# Altium PCB Flight Controller SoM.PcbDoc (part 3 of 3)
Units mm, origin at the board's own origin, x right, y up, seen from the top; angles counter-clockwise.
Board outline 55 x 40 mm, 8 copper layers (L1, L2, L3, L4, L5, L6, L7, L8), stack 1.028 mm thick; 176 components, 217 nets, 863 pads, 595 vias.
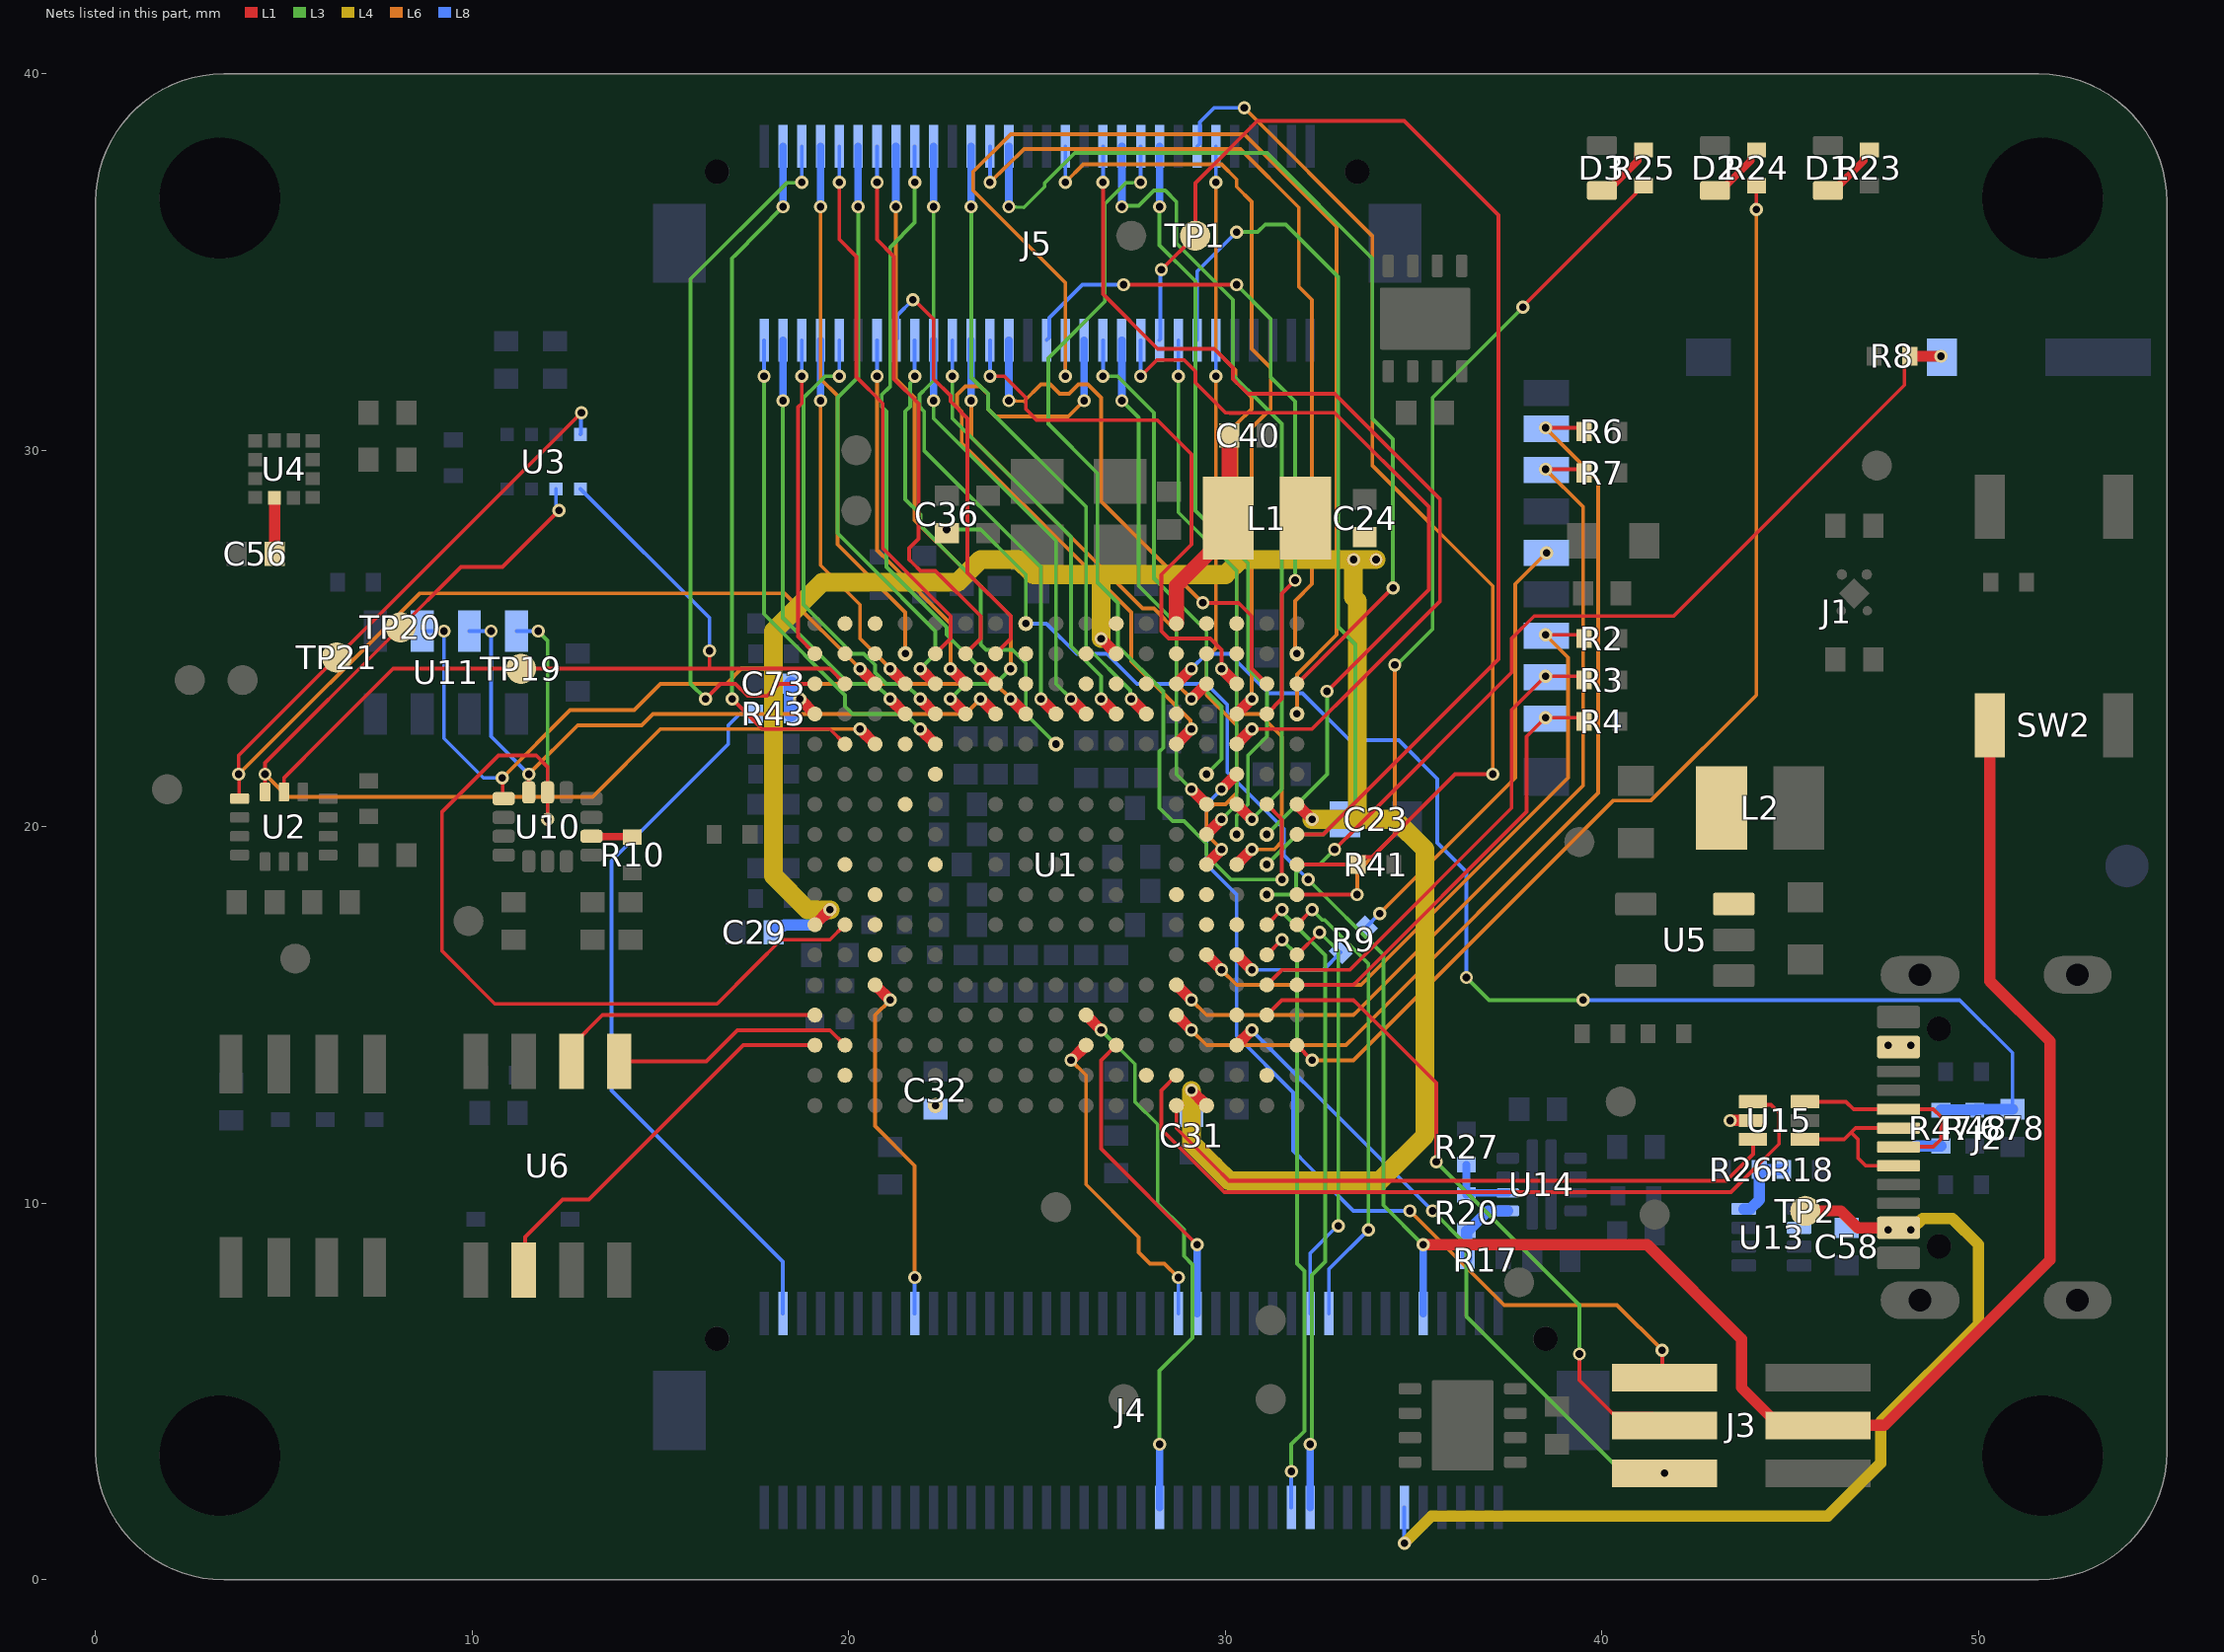
[diagram p9: the nets of this part, all layers, seen from the top]

## Via types
v1: diameter 0.35, hole 0.2, L1 to L8, tented both sides, 595 vias

## Nets (pads, with @x,y where several pads share a name; then routed paths per layer and width w, separated by ;. In a path a pad name is that pad's centre, name@x,y a point inside that pad or via, vN(x,y) a via of type N, cw(c..) or ccw(c..) an arc to the next point about the centre after c; other vN are vias at no path point) (continued)
LED_G: R24.2 U1.A15 | length 30
  L1 w0.1: U1.A15@31.9,14.2 v1(32.3,13.8) ; v1(44.1,36.4) 44.1,36.975 44.05,37.025 R24.2@44.1,37.025
  L6 w0.1: v1(32.3,13.8) 33.4,13.8 33.5,13.9 40.3,20.7 41.3,20.7 44.1,23.5 v1(44.1,36.4)
LED_R: R25.2 U1.A10 | length 23.6
  L1 w0.1: U1.A10@31.9,18.2 32.6,18.2 v1(33.5,18.2) ; v1(37.9,33.8) 37.9,33.825 40.9,36.825 40.9,36.875 41.05,37.025 R25.2@41.1,37.025
  L3 w0.1: v1(34.5,24.3) 34.55,24.3 35.5,25.25 35.5,31.4 v1(37.9,33.8)
  L6 w0.1: v1(33.5,18.2) 33.5,18.8 34.5,19.8 v1(34.5,24.3)
NARMED: J4.47 U1.G15 | length 8.3
  L1 w0.1: U1.G15@27.1,14.2 26.7,13.8 26.7,11.45 v1(29.25,8.9)
  L8 w0.2: J4.47@29.25,7.075 v1(29.25,8.9)
NetC56_1: C56.1 U4.5 | length 1.5
  L1 w0.3: C56.1@4.75,27.25 U4.5@4.75,28.738
NetD1_2: D1.2 R23.1 | length 1.6
  L1 w0.2: D1.2@46,36.9 46.15,36.9 46.95,37.7 46.95,37.875 47.05,37.975 R23.1@47.1,37.975
NetD2_2: D2.2 R24.1 | length 1.6
  L1 w0.2: D2.2@43,36.9 43.15,36.9 43.95,37.7 43.95,37.875 44.05,37.975 R24.1@44.1,37.975
NetD3_2: D3.2 R25.1 | length 1.6
  L1 w0.2: D3.2@40,36.9 40.15,36.9 40.95,37.7 40.95,37.875 41.05,37.975 R25.1@41.1,37.975
NetL2_1: L2.1 U5.3
NetR10_2: R10.2 U10.9 | length 1.1
  L1 w0.2: U10.9@13.165,19.75 13.177,19.738 14.238,19.738 R10.2@14.25,19.725
nRST: C36.1 J3.3 J4.71 SW2.1 U1.K1 | length 64.6
  L1 w0.1: C36.1@22.6,27.8 v1(22.6,27.9)
  L1 w0.3: v1(35.25,8.9) 41.2,8.9 43.7,6.4 43.7,5.11 44.71,4.1 47.5,4.1 51.9,8.5 51.9,14.3 50.3,15.9 SW2.1@50.3,22.7
  L3 w0.1: v1(22.6,27.9) 23.5,27.9 24.4,27 24.7,26.7 v1(24.7,25.4) ; v1(32.2,18.6) 34.2,16.6 34.2,9.95 v1(35.25,8.9)
  L8 w0.1: v1(24.7,25.4) 25.25,25.4 26.05,24.6 26.85,24.6 27.65,23.8 29.5,23.8 30.05,23.25 30.05,21.45 31.55,19.95 31.55,19.25 v1(32.2,18.6)
  L8 w0.2: J4.71@35.25,7.075 v1(35.25,8.9)
OVLO: R20.1 R27.2 U14.2 | length 1.9
  L8 w0.2: R27.2@36.4,11.025 R20.1@36.4,10.225 36.45,10.275 U14.2@37.5,10.275
PA0C: U1.T1
PA1C: U1.T2
PAY_AN1: J5.2 U1.N5 | length 13.4
  L1 w0.3: v1(21.9,22.6) U1.N5@22.3,22.2
  L3 w0.1: v1(17.75,31.97) 17.75,27 17.75,25.65 19.9,23.5 19.9,23.2 20.1,23 21.5,23 v1(21.9,22.6)
  L8 w0.1: v1(17.75,31.97) J5.2@17.75,32.925
PAY_AN2: J5.3 U1.T5 | length 18.7
  L1 w0.1: v1(16.9,23.4) 17.5,22.8 17.7,22.6 19.5,22.6 U1.T5@19.9,22.2
  L3 w0.1: v1(16.9,23.4) 16.9,35.1 17,35.2 v1(18.25,36.47)
  L8 w0.2: v1(18.25,36.47) J5.3@18.25,38.075
PAY_AN3: J5.4 U1.P4 | length 11.7
  L1 w0.3: v1(21.1,23.4) U1.P4@21.5,23
  L3 w0.1: v1(18.25,31.32) 18.25,27 18.25,25.55 20,23.8 20.7,23.8 v1(21.1,23.4)
  L8 w0.2: v1(18.25,31.32) J5.4@18.25,32.925
PAY_AN4: J5.5 U1.U3 | length 19.6
  L1 w0.1: v1(16.2,23.4) 16.6,23.8 16.99,23.8 17.315,23.475 17.825,23.475 18.15,23.8 U1.U3@19.1,23.8
  L3 w0.1: v1(16.2,23.4) 15.8,23.8 15.8,34.55 18.35,37.1 v1(18.75,37.12)
  L8 w0.1: v1(18.75,37.12) J5.5@18.75,38.075
PAY_AN5: J5.7 U1.P2 | length 14.4
  L6 w0.1: v1(19.25,36.47) 19.25,31.9 19.7,31.45 19.7,27.5 21.5,25.7 v1(21.5,24.6)
  L8 w0.2: v1(19.25,36.47) J5.7@19.25,38.075
PAY_AN6: J5.8 U1.P3 | length 10.1
  L1 w0.3: v1(21.1,24.2) U1.P3@21.5,23.8
  L6 w0.1: v1(19.25,31.32) 19.25,26.95 20.3,25.9 20.3,25 v1(21.1,24.2)
  L8 w0.2: v1(19.25,31.32) J5.8@19.25,32.925
PAY_AN7: J5.9 U1.N2 | length 14.9
  L1 w0.1: v1(19.75,37.12) 19.75,35.6 20.2,35.15 20.2,31.95 20.9,31.25 20.9,27.4 21.3,27 22.7,25.6 22.7,25 U1.N2@22.3,24.6
  L8 w0.1: v1(19.75,37.12) J5.9@19.75,38.075
PAY_AN8: J5.10 U1.N4 | length 12.5
  L1 w0.3: v1(21.9,23.4) U1.N4@22.3,23
  L3 w0.1: 19.095,31.695 18.875,31.475 18.8,31.4 18.8,27 18.8,25.9 20.1,24.6 20.4,24.6 20.7,24.3 20.7,24.1 21,23.8 21.5,23.8 v1(21.9,23.4) ; 19.095,31.695 19.37,31.97 v1(19.75,31.97)
  L8 w0.1: v1(19.75,31.97) J5.10@19.75,32.925
PAY_AN9: J5.13 U1.M2 | length 15.2
  L1 w0.1: v1(20.75,37.12) 20.75,35.6 21.2,35.15 21.2,31.9 21.85,31.25 21.85,27.65 21.6,27.4 21.6,27.1 21.7,27 21.9,26.8 22.3,26.8 23.5,25.6 23.5,25 U1.M2@23.1,24.6
  L8 w0.1: v1(20.75,37.12) J5.13@20.75,38.075
PAY_AN10: J5.14 U1.M3 | length 10.1
  L1 w0.3: v1(22.7,24.2) U1.M3@23.1,23.8
  L6 w0.1: v1(20.75,31.97) 20.75,27.35 21.1,27 22.7,25.4 v1(22.7,24.2)
  L8 w0.1: v1(20.75,31.97) J5.14@20.75,32.925
PAY_AN11: J5.15 U1.M4 | length 17.6
  L1 w0.3: v1(22.7,23.4) U1.M4@23.1,23
  L3 w0.1: v1(22.7,23.4) 23.1,23.8 23.9,23.8 v1(24.3,24.2)
  L6 w0.1: v1(21.25,36.47) 21.25,31.9 21.75,31.4 21.75,28.15 22.9,27 24.3,25.6 v1(24.3,24.2)
  L8 w0.2: v1(21.25,36.47) J5.15@21.25,38.075
PAY_AN12: J5.16 U1.L2 | length 11.9
  L1 w0.1: v1(21.7,34) 21.735,34 22.25,33.485 22.25,31.9 22.7,31.45 22.7,31.3 23.15,30.85 23.15,26.75 24.3,25.6 24.3,25 U1.L2@23.9,24.6
  L8 w0.1: J5.16@21.25,32.925 21.291,32.966 21.291,33.591 v1(21.7,34)
PAY_AN13: J5.17 U1.L3 | length 15.9
  L1 w0.3: v1(23.5,24.2) U1.L3@23.9,23.8
  L3 w0.1: v1(21.75,37.12) 21.75,36.05 21.1,35.4 21.1,31.7 20.875,31.475 20.875,31.165 21,31.04 21,27 21,26.9 22.6,25.3 22.6,25.1 v1(23.5,24.2)
  L8 w0.1: v1(21.75,37.12) J5.17@21.75,38.075
PAY_AN14: J5.18 U1.J5 | length 12.9
  L3 w0.1: v1(21.75,31.97) 21.75,31.911 21.625,31.786 21.625,31.165 21.5,31.04 21.5,28.7 21.9,28.3 21.9,28 22.9,27 23.5,26.4 23.5,24.85 23.65,24.7 24.35,24.7 24.7,24.35 24.7,23 v1(25.5,22.2)
  L8 w0.1: v1(21.75,31.97) J5.18@21.75,32.925
PAY_AN15: J5.19 U1.J4 | length 16.7
  L1 w0.3: v1(25.1,23.4) U1.J4@25.5,23
  L3 w0.1: 22.095,31.695 21.875,31.475 21.875,31.165 22,31.04 22,30 25,27 25.1,26.9 v1(25.1,23.4) ; 22.095,31.695 22.25,31.85 v1(22.25,36.47)
  L8 w0.2: v1(22.25,36.47) J5.19@22.25,38.075
PAY_AN16: J5.20 U1.H4 | length 11.6
  L1 w0.3: v1(25.9,23.4) U1.H4@26.3,23
  L3 w0.1: v1(22.25,31.32) 22.25,30.85 25.5,27.6 25.5,27 25.5,23.8 v1(25.9,23.4)
  L8 w0.2: v1(22.25,31.32) J5.20@22.25,32.925
PAY_IO1: J5.22 U1.G4 | length 11.7
  L1 w0.3: v1(26.7,23.4) U1.G4@27.1,23
  L3 w0.1: v1(22.75,31.97) 22.75,30.85 25.9,27.7 25.9,27 25.9,24.8 26.7,24 v1(26.7,23.4)
  L8 w0.1: v1(22.75,31.97) J5.22@22.75,32.925
PAY_IO2: J5.23 U1.F4 | length 17
  L1 w0.3: v1(27.5,23.4) U1.F4@27.9,23
  L3 w0.1: v1(23.25,36.47) 23.25,31.94 23.595,31.595 23.605,31.595 23.7,31.5 23.7,31.1 26.3,28.5 26.3,24.8 27.47,23.63 27.47,23.43 v1(27.5,23.4)
  L8 w0.2: v1(23.25,36.47) J5.23@23.25,38.075
PAY_IO3: J5.24 U1.D3 | length 12.7
  L1 w0.3: v1(29.1,23.4) U1.D3@29.5,23.8
  L6 w0.1: v1(23.25,31.32) 23.25,30.35 26.6,27 27.8,25.8 28.1,25.8 28.7,25.2 28.7,23.8 v1(29.1,23.4)
  L8 w0.2: v1(23.25,31.32) J5.24@23.25,32.925
PAY_IO4: J5.25 U1.A2 | length 22.4
  L6 w0.1: v1(23.75,37.12) 24.653,38 30.4,38 31.95,36.45 31.95,34.35 32.3,34 32.3,26.45 31.85,26 31.85,24.65 v1(31.9,24.6)
  L8 w0.1: v1(23.75,37.12) J5.25@23.75,38.075
PAY_IO5: J5.26 U1.C3 | length 15.2
  L1 w0.1: v1(23.75,31.97) 24.13,31.97 24.7,31.4 24.7,31.1 25,30.8 28.2,30.8 29.1,29.9 29.1,27.5 28.3,26.7 28.3,25.2 28.5,25 29.6,25 29.9,24.7 v1(29.9,24.2)
  L1 w0.3: v1(29.9,24.2) U1.C3@30.3,23.8
  L8 w0.1: v1(23.75,31.97) J5.26@23.75,32.925
PAY_IO6: J5.27 U1.A3 | length 25.7
  L1 w0.1: U1.A3@31.9,23.8 v1(34.45,26.35)
  L3 w0.1: v1(24.25,36.47) 24.65,36.45 25.2,37 25.2,37.1 26,37.9 31.1,37.9 33.9,35.1 33.9,30.85 34.45,30.3 v1(34.45,26.35)
  L8 w0.2: v1(24.25,36.47) J5.27@24.25,38.075
PAY_IO7: J5.28 U1.B3 | length 14.6
  L1 w0.1: v1(29.4,25.95) 30.35,25.95 30.7,25.6 30.7,24.2 U1.B3@31.1,23.8
  L6 w0.1: v1(24.25,31.32) 24.65,31.3 25.1,31.75 25.35,31.75 25.6,31.5 25.85,31.5 26.1,31.75 26.35,31.75 26.7,31.4 26.7,28.65 v1(29.4,25.95)
  L8 w0.2: v1(24.25,31.32) J5.28@24.25,32.925
PAY_IO8: J5.34 U1.A4 | length 31.9
  L6 w0.1: v1(25.75,31.97) 25.75,34.45 23.3,36.9 23.3,37.4 24.3,38.4 30.5,38.4 32.95,35.95 32.95,25.1 31.9,24.05 v1(31.9,23)
  L8 w0.1: v1(25.75,31.97) J5.34@25.75,32.925
PAY_IO9: J5.36 U1.E5 | length 17.8
  L1 w0.3: U1.E5@28.7,22.2 v1(29.1,22.6)
  L6 w0.1: v1(26.25,31.32) 25.83,30.9 23.9,30.9 23.7,31.1 23.7,31.49 23.49,31.7 23.1,31.7 22.875,31.475 22.875,31.165 23,31.04 23,30.2 26.2,27 27.5,25.7 27.5,24.4 29.07,22.83 29.07,22.63 v1(29.1,22.6)
  L8 w0.2: v1(26.25,31.32) J5.36@26.25,32.925
PAY_IO10: J5.37 U1.C5 | length 25
  L1 w0.1: v1(26.75,37.12) 26.75,34.15 28.2,32.7 29.7,32.7 30.2,32.2 30.2,31.9 30.405,31.695 30.6,31.5 32.9,31.5 35.7,28.7 35.7,26 33.5,23.8 32.3,22.6 v1(30.7,22.6)
  L1 w0.3: U1.C5@30.3,22.2 v1(30.7,22.6)
  L8 w0.1: v1(26.75,37.12) J5.37@26.75,38.075
PAY_IO11: J5.38 U1.D6 | length 13.2
  L3 w0.1: v1(26.75,31.97) 27.13,31.97 27.405,31.695 27.625,31.475 28.1,31 28.1,27 28.1,26.6 29.5,25.2 29.5,23.6 29.9,23.2 29.9,21.8 v1(29.5,21.4)
  L8 w0.1: v1(26.75,31.97) J5.38@26.75,32.925
PAY_IO12: J5.39 U1.C7 | length 21.8
  L1 w0.3: U1.C7@30.3,20.6 v1(30.7,20.2)
  L3 w0.1: v1(27.25,36.47) 27.28,36.5 27.7,36.5 28.1,36.9 28.4,36.9 28.7,36.6 28.7,35.5 30.2,34 30.2,32 30.375,31.825 30.375,31.815 30.595,31.595 30.605,31.595 31.5,30.7 31.5,27 31.5,21 v1(30.7,20.2)
  L8 w0.2: v1(27.25,36.47) J5.39@27.25,38.075
PAY_IO13: J5.40 U1.D7 | length 13.3
  L1 w0.3: v1(29.1,21) U1.D7@29.5,20.6
  L3 w0.1: v1(27.25,31.32) 27.7,30.87 27.7,27 27.7,26.4 28.7,25.4 28.7,21.4 v1(29.1,21)
  L8 w0.2: v1(27.25,31.32) J5.40@27.25,32.925
PAY_IO14: J5.41 U1.B7 | length 26.5
  L1 w0.1: U1.B7@31.1,20.6 31.5,20.2 v1(31.5,18.6)
  L3 w0.1: v1(27.75,37.12) 27.35,37.1 26.8,36.55 26.8,33.95 25.3,32.45 25.3,30.7 26.6,29.4 26.6,27 26.6,26.5 27.15,25.95 27.15,24.8 28.35,23.6 28.35,22.1 28.25,22 28.25,20.5 28.6,20.15 28.9,20.15 29.5,19.55 29.5,19.25 30.15,18.6 v1(31.5,18.6)
  L8 w0.1: v1(27.75,37.12) J5.41@27.75,38.075
PAY_IO15: J5.42 U1.B8 | length 21.1
  L1 w0.1: v1(27.75,31.97) 28.18,32.4 28.9,32.4 29.2,32.1 29.2,31.8 30,31 30.11,31 30.115,30.995 30.385,30.995 30.39,31 32.9,31 35.4,28.5 35.4,26.3 33.5,24.4 v1(32.7,23.6)
  L3 w0.1: v1(31.1,19.8) 32.7,21.4 v1(32.7,23.6)
  L8 w0.1: v1(27.75,31.97) J5.42@27.75,32.925
PAY_IO16: J5.43 U1.C8 | length 19.8
  L3 w0.1: v1(28.25,36.47) 28.25,35.45 29.2,34.5 29.2,28.4 30.6,27 30.6,24.2 31.1,23.7 31.1,22.4 30.6,21.9 30.6,20.6 30.3,20.3 v1(30.3,19.8)
  L8 w0.2: v1(28.25,36.47) J5.43@28.25,38.075
PAY_IO17: J5.44 TP1.1 U1.A8 | length 33.4
  L1 w0.1: v1(28.3,34.8) TP1.1@29.2,35.7 29.2,37.1 30.85,38.75 34.75,38.75 37.25,36.25 37.25,24.45 32.6,19.8 U1.A8@31.9,19.8
  L8 w0.1: J5.44@28.25,32.925 28.275,32.95 28.275,34.775 v1(28.3,34.8)
PAY_TIM_IN: J5.11 U1.N3 | length 15.9
  L1 w0.3: v1(21.9,24.2) U1.N3@22.3,23.8
  L3 w0.1: v1(20.25,36.47) 20.25,31.95 19.7,31.4 19.7,27.8 20.5,27 22.3,25.2 22.3,24.6 v1(21.9,24.2)
  L8 w0.2: v1(20.25,36.47) J5.11@20.25,38.075
PAY_TIM_OUT: J5.6 U1.U2 | length 8.6
  L1 w0.1: v1(18.75,31.97) 18.75,31.25 18.65,31.15 18.65,25.05 U1.U2@19.1,24.6
  L8 w0.1: v1(18.75,31.97) J5.6@18.75,32.925
PAY_UART_RX: J5.33 U1.C4 | length 20.8
  L1 w0.3: U1.C4@30.3,23 v1(30.7,23.4)
  L6 w0.1: v1(25.75,37.12) 26.23,37.6 29.9,37.6 30.3,37.2 30.3,37 30.7,36.6 30.7,32.7 31.2,32.2 31.2,31.1 30.7,30.6 30.7,27 v1(30.7,23.4)
  L8 w0.1: v1(25.75,37.12) J5.33@25.75,38.075
PAY_UART_TX: J5.32 U1.B4 | length 18.3
  L1 w0.1: v1(27.3,34.4) v1(30.3,34.4) ; U1.B4@31.1,23 31.5,23.4 31.5,26.2 v1(31.85,26.55)
  L3 w0.1: v1(30.3,34.4) 31.2,33.5 31.2,31.95 31.85,31.3 v1(31.85,26.55)
  L8 w0.1: J5.32@25.25,32.925 25.325,33 25.325,33.525 26.2,34.4 v1(27.3,34.4)
PC2C: U1.R1
PC3C: U1.R2
PC14: U1.C2
PC15: U1.C1
PD7: U1.C11
PD10: U1.T16
PE4: U1.D2
PE5: U1.D1
PE8: U1.T9
PE10: U1.N9
PE12: U1.R10
PE15: U1.R11
PF1: U1.G3
PF2: U1.G1
PF6: U1.K2
PF7: U1.K3
PF13: U1.P7
PG7: U1.F16
PH15: U1.B16
PI3: U1.C14
PI8: U1.E4
PI9: U1.E2
PI10: U1.F3
PI13: U1.H2
PI14: U1.H3
PI15: U1.P5
PJ0: U1.N6
PJ5: U1.R12
PJ12: U1.D11
PJ13: U1.E10
PJ14: U1.D10
PR1: R18.1 R26.2 U13.4 | length 2
  L8 w0.3: U13.4@43.765,9.85 43.935,9.85 44.175,10.09 R26.2@44.175,10.9 R18.1@44.825,10.9
SAFETY_LED: J4.44 U1.H14 | length 14.6
  L1 w0.3: U1.H14@26.3,15 v1(26.7,14.6)
  L3 w0.1: v1(26.7,14.6) 27.6,13.7 27.6,12.7 28.2,12.1 28.2,11 28.2,10 28.9,9.3 28.9,8.6 29.125,8.375 29.125,6.427 28.25,5.552 v1(28.25,3.6)
  L8 w0.2: J4.44@28.25,1.925 v1(28.25,3.6)
SAFETY_SW: J4.45 U1.H15 | length 8.7
  L1 w0.3: v1(25.9,13.8) U1.H15@26.3,14.2
  L6 w0.1: v1(25.9,13.8) 26.3,13.4 26.3,11 26.3,10.5 27.7,9.1 27.7,8.7 28,8.4 28.38,8.4 v1(28.75,8.03)
  L8 w0.1: J4.45@28.75,7.075 v1(28.75,8.03)
SBUS_IN: J4.17 U1.R13 | length 9.5
  L1 w0.3: U1.R13@20.7,15.8 v1(21.1,15.4)
  L6 w0.1: v1(21.1,15.4) 20.7,15 20.7,12.05 21.75,11 v1(21.75,8.03)
  L8 w0.1: J4.17@21.75,7.075 v1(21.75,8.03)
SD_CD: J1.10 R8.1 U1.B10 | length 25
  L1 w0.1: v1(32.9,19.4) 33.5,20 37.6,24.1 37.6,25 38.2,25.6 41.9,25.6 48.031,31.731 48.031,32.356 R8.1@48.175,32.5
  L1 w0.3: R8.1@48.175,32.5 v1(49,32.5)
  L3 w0.1: v1(31.1,18.2) 31.7,18.2 31.875,18.375 31.875,18.775 32.1,19 32.5,19 v1(32.9,19.4)
SD_CLK: J1.5 R9.1 | length 11.9
  L6 w0.1: v1(34.1,17.7) 37.7,21.3 37.7,26.45 v1(38.525,27.275)
  L8 w0.1: R9.1@33.736,17.336 v1(34.1,17.7)
SD_CLK_R: R9.2 U1.C12 | length 3.1
  L1 w0.3: U1.C12@30.3,16.6 v1(30.7,16.2)
  L8 w0.1: v1(30.7,16.2) 32.6,16.2 R9.2@33.064,16.664
SD_CMD: J1.3 R2.1 U1.D12 | length 17.3
  L1 w0.1: v1(38.5,25.1) 39.425,25.1 R2.1@39.525,25
  L1 w0.3: U1.D12@29.5,16.6 v1(29.9,16.2)
  L6 w0.1: v1(29.9,16.2) 30.3,15.8 33.5,15.8 33.6,15.8 39.1,21.3 39.1,24.5 v1(38.5,25.1)
SD_D0: J1.7 R7.1 U1.E13 | length 23.5
  L1 w0.1: v1(38.5,29.5) 39.425,29.5 R7.1@39.525,29.4
  L1 w0.3: U1.E13@28.7,15.8 v1(29.1,15.4)
  L6 w0.1: v1(29.1,15.4) 29.5,15 33.4,15 33.5,15.1 39.5,21.1 39.5,28.5 v1(38.5,29.5)
SD_D1: J1.8 R6.1 U1.E14 | length 25.7
  L1 w0.1: v1(38.5,30.6) 39.425,30.6 R6.1@39.525,30.5
  L1 w0.3: U1.E14@28.7,15 v1(29.1,14.6)
  L6 w0.1: v1(29.1,14.6) 29.5,14.2 33.2,14.2 33.5,14.5 39.9,20.9 39.9,29.2 v1(38.5,30.6)
SD_D2: J1.1 R4.1 U1.A13 | length 11.8
  L1 w0.1: U1.A13@31.9,15.8 33.4,15.8 33.5,15.9 38,20.4 38,22.4 v1(38.5,22.9) 39.425,22.9 R4.1@39.525,22.8
SD_D3: J1.2 R3.1 U1.B13 | length 13.4
  L1 w0.1: U1.B13@31.1,15.8 31.5,16.2 33.3,16.2 33.5,16.4 37.6,20.5 37.6,23.1 v1(38.5,24) 39.425,24 R3.1@39.525,23.9
SERVO_RAIL_SENSE: C73.1 R43.1 U1.U4 | length 1.4
  L1 w0.3: v1(18.7,23.4) U1.U4@19.1,23
  L8 w0.4: R43.1@18.468,23.008 C73.1@18.468,23.793
SERVO_RAIL_SENSE_F: J4.3 R43.2 | length 19.6
  L8 w0.1: R43.2@17.525,23 17.5,23 17.1,23 16.8,22.7 16.8,22.2 13.7,19.1 13.7,13 18.25,8.45 J4.3@18.25,7.075
SPI1_MISO: TP21.1 U1.R3 U2.1 U3.5 | length 34.5
  L1 w0.1: U2.1@3.824,20.749 3.82,20.749 3.81,20.76 3.81,21.39 v1(3.8,21.4) 3.8,21.9 11.6,29.7 v1(12.9,31)
  L1 w0.3: v1(20.3,24.2) U1.R3@20.7,23.8
  L6 w0.1: v1(3.8,21.4) 8.6,26.2 18.3,26.2 v1(20.3,24.2)
  L8 w0.1: U3.5@12.875,30.425 12.888,30.438 12.888,30.987 v1(12.9,31)
SPI1_MOSI: TP20.1 U1.R5 U2.14 U3.3 | length 29.3
  L1 w0.1: U2.14@4.5,20.925 v1(4.5,21.4) 4.5,21.7 7.9,25.1 9.7,26.9 10.2,26.9 10.8,26.9 v1(12.3,28.4)
  L1 w0.3: v1(20.3,22.6) U1.R5@20.7,22.2
  L6 w0.1: v1(4.5,21.4) 5.1,20.8 13.2,20.8 15,22.6 v1(20.3,22.6)
  L8 w0.1: U3.3@12.225,28.975 12.225,28.543 12.3,28.468 v1(12.3,28.4)
SPI1_SCK: TP19.1 U1.T3 U2.13 U3.4 | length 22.8
  L1 w0.1: U2.13@5,20.925 5.006,20.931 5.006,21.306 6.1,22.4 7.9,24.2 16.3,24.2 ; v1@16.3,24.675 16.3,24.2 ; U1.T3@19.9,23.8 19.5,24.2 16.3,24.2
  L8 w0.1: U3.4@12.875,28.975 16.3,25.55 v1(16.3,24.675)
SPI2_MISO: U1.U15 U6.2 | length 10.7
  L1 w0.1: U6.2@11.365,8.23 11.402,8.267 11.402,9.102 12.4,10.1 13.1,10.1 17.2,14.2 17.5,14.2 U1.U15@19.1,14.2
SPI2_MOSI: U1.T15 U6.5 | length 6.5
  L1 w0.1: U6.5@13.905,13.77 16.213,13.77 17.043,14.6 19.5,14.6 U1.T15@19.9,14.2
SPI2_SCK: U1.U14 U6.6 | length 7.2
  L1 w0.1: U6.6@12.635,13.77 12.635,14.18 13.455,15 17.5,15 U1.U14@19.1,15
SPI5_MISO: U1.K4 U10.1 U11.6 | length 21.6
  L1 w0.1: v1(10.8,21.3) 10.81,21.29 10.81,20.775 U10.1@10.835,20.75
  L1 w0.3: v1(24.3,23.4) U1.K4@24.7,23
  L6 w0.1: v1(10.8,21.3) 12.6,23.1 14.3,23.1 15,23.8 16.75,23.8 17.15,24.2 17.75,24.2 18.15,23.8 23.9,23.8 v1(24.3,23.4)
  L8 w0.1: U11.6@8.675,25.2 v1(9.25,25.2) 9.25,22.35 10.3,21.3 v1(10.8,21.3)
SPI5_MOSI: U1.L4 U10.14 U11.7 | length 18.7
  L1 w0.1: U10.14@11.5,20.915 v1(11.5,21.4)
  L1 w0.3: v1(23.5,23.4) U1.L4@23.9,23
  L6 w0.1: v1(11.5,21.4) 12.8,22.7 14.5,22.7 14.8,23 23.1,23 v1(23.5,23.4)
  L8 w0.1: U11.7@9.925,25.2 v1(10.5,25.2) 10.5,22.4 v1(11.5,21.4)
SPI5_SCK: U1.T11 U10.13 U11.8 | length 26.5
  L1 w0.1: v1(12,20.2) 12,21.6 11.7,21.9 10.7,21.9 9.2,20.4 9.2,16.7 10.6,15.3 16.5,15.3 17.5,16.3 18.2,17 19.5,17 U1.T11@19.9,17.4
  L3 w0.1: v1(11.75,25.2) 12,24.95 v1(12,20.2)
  L8 w0.1: U11.8@11.175,25.2 v1(11.75,25.2)
SPI6_CS1: J5.47 R41.1 U1.A9 | length 28.7
  L1 w0.1: U1.A9@31.9,19 R41.1@33.525,19 33.525,19.05 33.675,19.2 33.9,19.2 36.1,21.4 v1(37.1,21.4)
  L6 w0.1: v1(30.5,39.1) 33.9,35.7 33.9,29.6 37.1,26.4 v1(37.1,21.4)
  L8 w0.1: J5.47@29.25,38.075 29.319,38.144 29.319,38.719 29.7,39.1 v1(30.5,39.1)
SPI6_DRDY1: J5.48 U1.B9 | length 23.8
  L3 w0.1: v1(30.3,35.8) 30.859,35.8 31.059,36 31.6,36 33,34.6 33,27 33,25.3 33.45,24.85 33.45,20.65 32.6,19.8 31.9,19.8 v1(31.1,19)
  L8 w0.1: J5.48@29.25,32.925 29.25,34.75 v1(30.3,35.8)
SPI6_MISO: J5.49 U1.C9 | length 21.2
  L1 w0.3: U1.C9@30.3,19 v1(30.7,19.4)
  L6 w0.1: v1(29.75,37.12) 29.75,32.65 30.2,32.2 30.265,32.135 30.265,31.835 30.405,31.695 30.625,31.475 30.7,31.4 30.7,31.1 30.3,30.7 30.3,23.2 30.5,23 30.9,23 31.5,22.4 31.5,19.6 31.3,19.4 v1(30.7,19.4)
  L8 w0.1: v1(29.75,37.12) J5.49@29.75,38.075
SPI6_MOSI: J5.46 U1.D8 | length 14.1
  L1 w0.3: U1.D8@29.5,19.8 v1(29.9,20.2)
  L3 w0.1: v1(28.75,31.97) 28.75,28.35 30.1,27 30.3,26.8 30.3,20.6 v1(29.9,20.2)
  L8 w0.1: v1(28.75,31.97) J5.46@28.75,32.925
SPI6_SCK: J5.50 U1.D9 | length 15.2
  L1 w0.3: U1.D9@29.5,19 v1(29.9,19.4)
  L6 w0.1: v1(29.75,31.97) 29.75,24.75 29.5,24.5 29.5,23.5 30.3,22.7 30.3,20.9 30,20.6 29.7,20.6 29.5,20.4 29.5,19.8 v1(29.9,19.4)
  L8 w0.1: v1(29.75,31.97) J5.50@29.75,32.925
SWCLK: J3.4 U1.B14 | length 17.8
  L1 w0.1: U1.B14@31.1,15 31.5,15.4 33.4,15.4 33.5,15.3 35.6,13.2 v1(35.6,11.1) ; v1(39.4,6) 39.4,5.3 40.28,4.42 41.345,4.42 J3.4@41.665,4.1
  L3 w0.1: v1(35.6,11.1) 39.4,7.3 v1(39.4,6)
SWDIO: J3.2 U1.C15 | length 17.5
  L1 w0.3: U1.C15@30.3,14.2 v1(30.7,14.6)
  L3 w0.1: v1(35.5,9.8) 36.4,8.9 36.4,7 40.57,2.83 v1(41.665,2.83)
  L8 w0.1: v1(30.7,14.6) 33.5,11.8 v1(35.5,9.8)
SWO: J3.6 U1.C6 | length 24
  L1 w0.1: v1(41.6,6.1) 41.6,5.435 J3.6@41.665,5.37
  L1 w0.3: v1(29.9,21) U1.C6@30.3,21.4
  L6 w0.1: v1(34.9,9.8) 37.4,7.3 40.4,7.3 v1(41.6,6.1)
  L8 w0.1: v1(29.9,21) 29.5,20.6 29.5,19 30.3,18.2 30.3,14.45 31.8,12.95 31.8,11.4 32.2,11 33.4,9.8 v1(34.9,9.8)
TELEM1_CTS: J4.58 U1.B12 | length 16
  L1 w0.1: U1.B12@31.1,16.6 v1(31.5,17)
  L3 w0.1: v1(31.5,17) 31.9,16.6 31.9,11 31.9,8.4 32.1,8.2 32.1,3.95 31.75,3.6 v1(31.75,2.88)
  L8 w0.1: J4.58@31.75,1.925 v1(31.75,2.88)
TELEM1_RTS: J4.59 U1.A12 | length 11.5
  L1 w0.1: U1.A12@31.9,16.6 v1(32.5,17.2)
  L3 w0.1: v1(32.5,17.2) 33,16.7 33,11 v1(33,9.4)
  L8 w0.1: J4.59@32.25,7.075 32.25,8.677 32.973,9.4 v1(33,9.4)
TELEM1_RX: J4.60 U1.B11 | length 17.1
  L1 w0.1: U1.B11@31.1,17.4 v1(31.5,17.8)
  L3 w0.1: v1(31.5,17.8) 31.5,17.74 32.65,16.59 32.65,11 32.65,8.45 32.3,8.1 32.3,3.65 v1(32.25,3.6)
  L8 w0.2: J4.60@32.25,1.925 v1(32.25,3.6)
TELEM1_TX: J4.61 U1.A11 | length 12.4
  L1 w0.1: U1.A11@31.9,17.4 v1(32.3,17.8)
  L3 w0.1: v1(32.3,17.8) 32.575,17.525 32.635,17.525 33.797,16.363 v1@33.797,9.303
  L8 w0.1: J4.61@32.75,7.075 32.75,8.25 v1(33.8,9.3)
USB_N: J2.A7 J2.B7 U15.1 | length 4.5
  L1 w0.1: U15.1@45.39,11.7 46.431,11.7 46.616,11.884 ; J2.B7@47.873,11 47,11 46.8,11.2 46.8,11.7 46.616,11.884 ; J2.A7@47.873,12 46.731,12 46.616,11.884
USB_P: J2.A6 J2.B6 U15.3 | length 5.6
  L1 w0.1: U15.3@45.39,12.7 46.481,12.7 46.681,12.5 J2.B6@47.873,12.5 48.8,12.5 49,12.3 49,11.7 48.8,11.5 J2.A6@47.873,11.5
USBD_N: U1.E17 U15.6 | length 17.2
  L1 w0.1: U1.E17@28.7,12.6 28.7,11.995 29.446,11.249 ; 29.447,11.249 29.696,11 30.096,10.6 43.3,10.6 44.01,11.31 U15.6@44.01,11.7
USBD_P: U1.E16 U15.4 | length 20.9
  L1 w0.1: U1.E16@28.7,13.4 28.3,13 28.3,11.971 29.271,11 29.783,10.487 29.883,10.387 ; 29.885,10.387 29.972,10.3 43.424,10.3 44.7,11.576 44.7,12.4 44.485,12.615 44.095,12.615 U15.4@44.01,12.7
UVLO: R17.1 R20.2 U14.1 | length 2
  L8 w0.3: R17.1@36.4,8.525 R20.2@36.4,9.275 ; R20.2@36.45,9.275 36.975,9.8 U14.1@37.5,9.8
VBUS: C58.1 J2.A4B9 J2.B4A9 J4.70 R47.2 TP2.1 U13.6 U15.5 | length 27.6
  L1 w0.3: v1(43.4,12.2) U15.5@44.01,12.2 ; TP2.1@45.4,9.8 46.341,9.8 46.791,9.35 J2.A4B9@47.873,9.35
  L4 w0.3: v1(34.75,0.97) 35.48,1.7 46,1.7 47.4,3.1 47.4,4.2 50,6.8 50,8.9 49.3,9.6 48.514,9.6 48.214,9.3 v1(48.2,9.3)
  L8 w0.1: v1(34.75,0.97) J4.70@34.75,1.925
  L8 w0.3: 48.3,11.5 48.325,11.525 R47.2@49,11.525
  other v1: 47.6,9.3 47.6,14.2 48.2,14.2
VBUS_SENSE: C78.1 R47.1 R48.1 U1.E3 | length 33
  L1 w0.3: U1.E3@28.7,23.8 v1(29.1,24.2)
  L3 w0.1: v1(36.4,16) 37,15.4 v1(39.5,15.4)
  L8 w0.1: v1(29.1,24.2) 29.5,24.6 30.1,24.6 31.15,23.55 32.05,23.55 33.3,22.3 33.5,22.3 34.6,22.3 35.625,21.275 35.625,19.575 36.4,18.8 v1(36.4,16) ; v1(39.5,15.4) 49.5,15.4 50.9,14 C78.1@50.9,12.5
  L8 w0.3: R47.1@49,12.475 R48.1@49.9,12.475 49.925,12.5 50.7,12.5 C78.1@50.9,12.5
VCAPDSI: C32.1 U1.N17
  other v1: 22.3,12.6
VCORE: C23.1 C24.1 C29.1 C31.1 L1.1 U1.A7 U1.D17 U1.G2 U1.U11 | length 59.2
  L1 w0.3: U1.U11@19.1,17.4 v1(19.5,17.8) ; v1(26.7,25) U1.G2@27.1,24.6 ; v1(29.1,13) U1.D17@29.5,12.6 ; U1.A7@31.9,20.6 v1(32.3,20.2)
  L4 w0.5: v1(19.5,17.8) 18.9,17.8 18,18.7 18,25.2 19.3,26.5 22.9,26.5 23.5,27.1 24.5,27.1 24.9,26.7 26.7,26.7 ; v1(26.7,25) 26.7,26.7 ; v1(29.1,13) 29.1,11.6 29.7,11 30.1,10.6 34.1,10.6 35.3,11.8 35.3,19.4 34.5,20.2 33.5,20.2 ; v1(32.3,20.2) 33.5,20.2 ; v1(34,27.1) v1(33.4,27.1) ; 26.7,26.7 30,26.7 30.4,27.1 v1(33.4,27.1) ; v1(33.4,27.1) 33.4,26.1 33.5,26 33.5,20.2
  L8 w0.3: C29.1@18,17.2 18,17.25 18.12,17.37 18.266,17.37 18.296,17.4 19.1,17.4 v1(19.5,17.8) ; C31.1@29.1,12.3 v1(29.1,13) ; v1(32.3,20.2) C23.1@33.175,20.2
VLXSMPS: C40.2 L1.2 U1.E1 | length 5.6
  L1 w0.4: U1.E1@28.7,25.4 28.7,26.4 30.074,27.774 L1.2@30.074,28.2 30.1,28.226 C40.2@30.1,30.4
pads on no net: J2.A8 J2.B8 J2.MH J4. J4.S1 J4.S2 J5. J5.S1 J5.S2 MH1.1 MH2.1 MH3.1 MH4.1 U1.H1 U1.H16 U1.T6 U2.9 U2.10 U2.11 U4.2 U4.7 U4.11 U4.12 U13.8 U14.3 U14.4

## Polygon pours and split planes (outlines as drawn)
GND on L7 "GND_L07_P152" (solid, pour order 152): 0,33.3 3.5,33.3 ccw(c3.5,36.5) 6.7,36.5 6.7,40 48.3,40 48.3,36.5 ccw(c51.5,36.5) 51.5,33.3 55,33.3 55,6.7 51.6,6.7 ccw(c51.6,3.4) 48.3,3.4 48.3,0 6.7,0 6.7,3.4 ccw(c3.4,3.4) 3.4,6.7 0,6.7
GND on L5 "GND_L05_P142" (solid, pour order 142): 0,33.3 3.5,33.3 ccw(c3.5,36.5) 6.7,36.5 6.7,40 48.3,40 48.3,36.5 ccw(c51.5,36.5) 51.5,33.3 55,33.3 55,6.7 51.6,6.7 ccw(c51.6,3.4) 48.3,3.4 48.3,0 6.7,0 6.7,3.4 ccw(c3.4,3.4) 3.4,6.7 0,6.7
GND on L2 "GND_L02_P122" (solid, pour order 122): 0.074,33.285 3.574,33.285 ccw(c3.574,36.485) 6.774,36.485 6.774,39.985 48.374,39.985 48.374,36.485 ccw(c51.574,36.485) 51.574,33.285 55.074,33.285 55.074,6.685 51.674,6.685 ccw(c51.673,3.385) 48.374,3.385 48.374,-0.015 6.774,-0.015 6.774,3.385 ccw(c3.474,3.385) 3.474,6.685 0.074,6.685
+VMUX on L1 "NONET_L02_P-001" (solid, pour order 139): 47,23.6 47.6,23.6 47.8,23.8 47.8,25.8 47.6,26 46.1,26 46,25.9 46,25.4 46.1,25.3 46.6,25.3 46.8,25.1 46.8,23.8
+3V3LDO on L1 "NONET_L02_P-001" (solid, pour order 140): 47,30.1 47.6,30.1 47.8,29.9 47.8,26.6 47.6,26.4 47.1,26.4 46.8,26.7 46.8,29.9
+D3V3 on L1 "NONET_L02_P-001" (solid, pour order 131): 44.5,21.6 44.5,18.8 44.9,18.4 44.9,17.6 46.8,17.6 47,17.8 47,19 46.8,19.2 46.1,19.2 45.9,19.4 45.9,21.6
+3V3LDO on L1 "NONET_L02_P-001" (solid, pour order 150): 5.6,29.6 6.7,29.6 6.9,29.4 7.6,29.4 7.7,29.5 7.7,31.7 7.6,31.8 6.6,31.8 5.6,30.8
VCORE on L1 "NONET_L02_P-001" (solid, pour order 141): 31.4,29.3 32.8,29.3 33,29.1 33,28.2 33.2,28 34.1,28 34.3,27.8 34.3,27 34.1,26.8 31.6,26.8 31.4,27
+VMUX on L1 "NONET_L02_P-001" (solid, pour order 133): 40.3,20.1 41.5,20.1 41.5,17.6 40.3,17.6
NetL2_1 on L1 "NONET_L02_P-001" (solid, pour order 129): 42.5,21.6 43.9,21.6 43.9,18.5 44.1,18.3 44.1,17.6 42.9,17.6 42.5,18
+3V3LDO on L1 "NONET_L02_P-001" (solid, remove dead copper, pour order 123): 5.9,19.4 6.6,19.4 6.9,19.7 6.9,20.6 7.6,20.6 7.6,17.8 7.4,17.6 6.4,17.6 6.4,18.4 5.9,18.9
GND on L8 "NONET_L02_P-001" (solid, pour order 149): 22.8,16.3 27.9,16.3 28,16.4 28,17.6 27.9,17.7 27.4,17.7 27.3,17.8 27.3,19.7 27.4,19.8 27.8,19.8 27.9,19.9 27.9,20.9 28,21 28.2,21 28.3,21.1 28.3,21.6 28.2,21.7 22.8,21.7 22.7,21.6 22.7,21.2 22.8,21.1 23,21.1 23.1,21 23.1,19.5 23.2,19.4 23.6,19.4 23.7,19.3 23.7,18.7 23.6,18.6 23.2,18.6 23.1,18.5 23.1,17 23,16.9 22.8,16.9 22.7,16.8 22.7,16.4
+5V_EFUSE on L8 "NONET_L02_P-001" (solid, pour order 137): 38.5,9.3 38.5,12.9 39,13.4 41.8,13.4 42.6,12.6 42.6,10.2 43.3,9.5 44.1,9.5 44.1,9.2 42.3,9.2 42,9.5 42,11.8 41.7,12.1 39.2,12.1 38.8,11.7 38.8,9.3
+VMUX on L8 "L8-+VMUX" (solid, pour order 138): 40,19.25 40.25,19 49,19 50,18 50,10 49,9 42.25,9 42,8.75 42,4 42.6,3.4 48.3,3.4 cw(c51.65,3.4) 51.65,6.75 53,6.75 54,7.75 54,23.75 53.5,24.25 46.75,24.25 46.25,23.75 46.25,20.75 45.5,20 40.25,20 40,19.75
+5V_EFUSE on L8 "NONET_L02_P-001" (solid, pour order 134): 32.2,38.8 32.8,38.8 32.9,38.7 32.9,32.3 32.8,32.2 32.2,32.2 32.1,32.3 32.1,38.7
+D3V3 on L8 "NONET_L02_P-001" (solid, pour order 136): 36.2,7.8 36.3,7.8 36.4,7.7 36.4,3.1 35.9,2.6 35.9,1.3 35.8,1.2 35.7,1.2 35.6,1.3 35.6,5.9 36.1,6.4 36.1,7.7
+D3V3 on L8 "NONET_L02_P-001" (solid, pour order 135): 31.7,38.8 31.8,38.8 31.9,38.7 31.9,34.1 31.4,33.6 31.4,32.3 31.3,32.2 31.2,32.2 31.1,32.3 31.1,35.8 31.6,36.3 31.6,38.7
+VCARRIER on L8 "NONET_L02_P-001" (solid, pour order 127): 36.7,1.2 38.4,1.2 38.6,1.4 38.6,7.8 38.6,8.9 38.3,9.2 38.3,11.8 38,11.8 38,9.2 37.8,9 37.2,9 37,8.8 37,8.1 36.6,7.7 36.6,1.3
VBUS on L8 "NONET_L02_P-001" (solid, pour order 80): 48.3,9 46,9 45.8,9.2 44.9,9.2 44.9,9.5 45.8,9.5 46.2,9.9 46.2,11.4 45.9,11.7 43.1,11.7 42.8,12 42.8,12.6 44.7,14.5 48.3,14.5 48.5,14.3 48.5,9.2
+D3V3 on L4 "+D3V3_L04_P146" (solid, remove dead copper, pour order 146): 0,33.3 3.5,33.3 ccw(c3.5,36.5) 6.7,36.5 6.7,40 48.3,40 48.3,36.5 ccw(c51.5,36.5) 51.5,33.3 55,33.3 55,6.7 51.6,6.7 ccw(c51.6,3.4) 48.3,3.4 48.3,0 6.7,0 6.7,3.4 ccw(c3.4,3.4) 3.4,6.7 0,6.7
+3V3LDO on L4 "L4-No Net" (solid, remove dead copper, pour order 145): 45,29.5 46.5,28 48,28 48,30.5 46,32.5 12,32.5 7.5,32.5 5.5,30.5 5.5,24 3,21.5 3,17.5 3.5,17 14.5,17 17,19.5 17,26.5 20,29.5

## Silkscreen, mask and mechanical layers (free items; w line width, h text height)
Top Overlay:
  drawing of 57 lines, arcs and shapes, not listed
  text "FLY·LEARN·COMPETE" at 20.9,38.322 h1.3
  text "GND" at 26.771,36.1 h0.8
  text "DBG2" at 28.286,36.1 h0.8
  text "PG2" at 38.125,34.025 h1.3 r45
  text "PK2" at 41.125,34.025 h1.3 r45
  text "3V3" at 44.125,34.025 h1.3 r45
  text "Weymen K. / Lachlan B. / REV A · NOV 2026" at 7.6,31.675 h1.1
  text "MAG" at 3.5,31.1 h1.3
  text "BOOT" at 50.3,30 h1.3
  text "GND" at 18.342,29.6 h0.8
  text "X" at 13.349,29.4 h1.3
  text "3V3LDO" at 44.25,29.2 h0.8
  text "+A3V3" at 17.612,28 h0.8
  text "Z" at 11.274,25.8 h1.3
  text "MOSI1" at 7.011,25.7 h0.8
  text "Y" at 14.649,25.7 h1.3
  text "MISO1" at 5.311,24.9 h0.8
  text "SDA" at 1.771,24.3 h0.8
  text "GND" at 3.171,24.3 h0.8
  text "RESET" at 50.3,24.2 h1.3
  text "SCK1" at 8.611,23.8 h0.8
  text "IMU1" at 3.4,21.5 h1.3
  text "IMU2" at 10.4,21.5 h1.3
  text "SCL" at 1.171,21.4 h0.8
  text "VMUX" at 37.192,19.2 h0.8
  text "INT2" at 7.211,17.1 h0.8
  text "USB-DEV" at 49,16.7 h1.3
  text "INT1" at 2.611,16.1 h0.8
  text "EEPROM" at 3.3,14.8 h1.3
  text "FRAM" at 9.7,14.8 h1.3
  text "EFUSE" at 37.806,12.3 h0.8
  text "STM32H757XIH6" at 18.403,10.6 h1.3
  text "GND" at 40.671,10.1 h0.8
  text "DBG2" at 22.811,9.5 h0.8
  text "VBUS" at 43.22,9.4 h0.8
  text "+VCARRIER" at 35.985,8.3 h0.8
  text "RX" at 30.471,7.3 h0.8
  text "SWD" at 41.8,6.3 h1.3
  text "GND" at 26.571,5.2 h0.8
  text "TX" at 30.471,5.2 h0.8
  text "Designed in Vancouver" at 20.9,0.322 h1.3
Bottom Overlay:
  drawing of 216 lines, arcs and shapes, not listed
  text "FLIGHT LOGS" at 47.799,33 h1.3
Top Solder:
  drawing of 6 lines, arcs and shapes, not listed
  text "Square / Lemon" at 10.3,1.251 h2.8
Mechanical 1:
  the board outline again, w0.1